# Altium PCB HF_Voltage_Transformer.PcbDoc
Units mil, origin at the board's own origin, x right, y up, seen from the top; angles counter-clockwise.
Board outline 3937.01 x 3937.01 mil, 2 copper layers (Top Layer, Bottom Layer); 48 components, 31 nets, 145 pads, 25 vias.
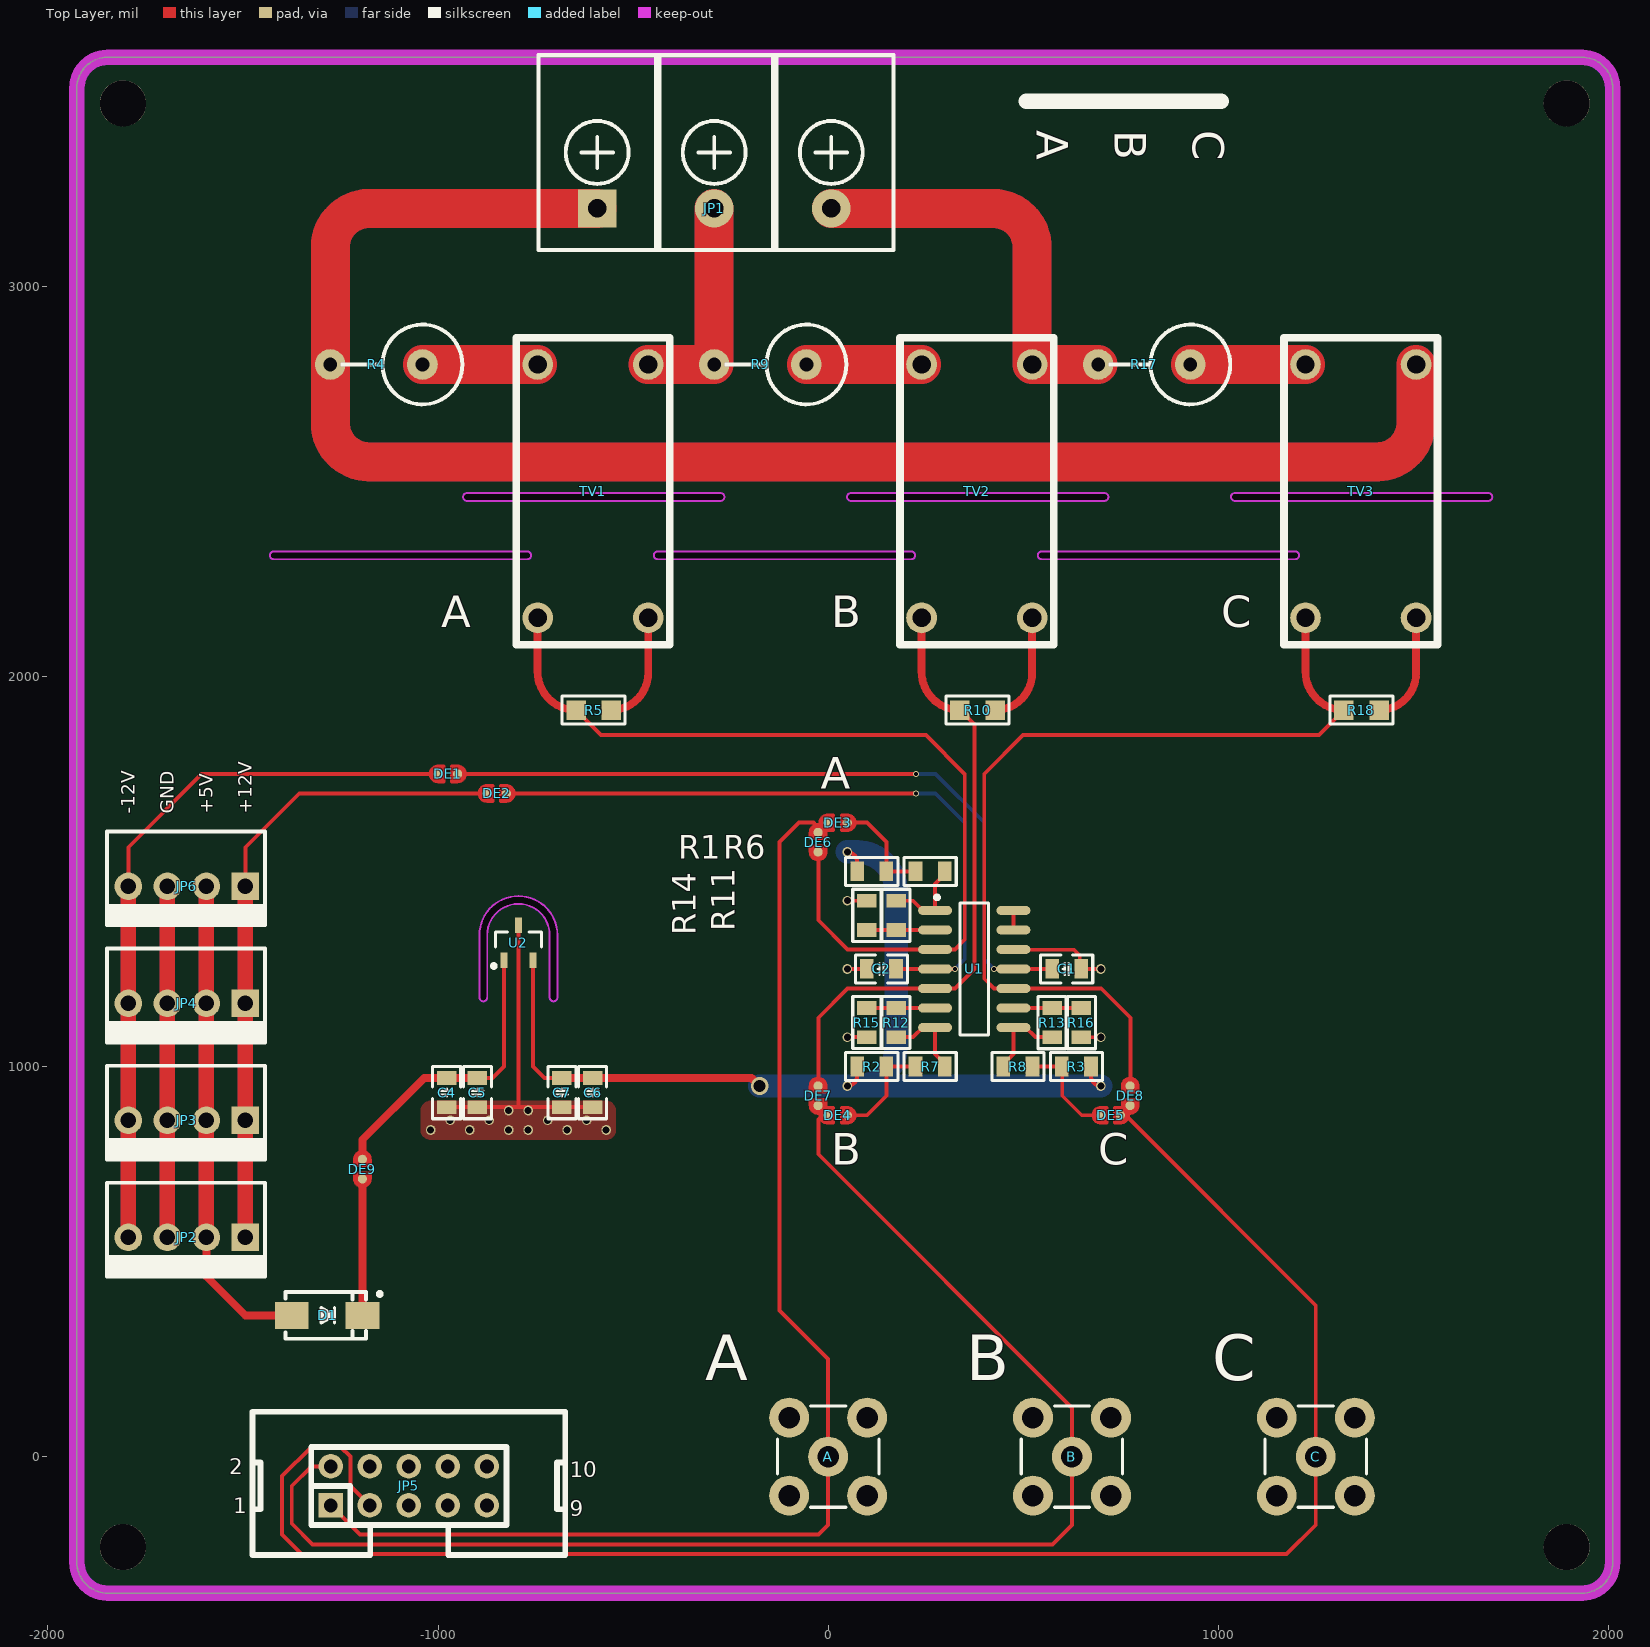
[diagram p0: Top Layer view]
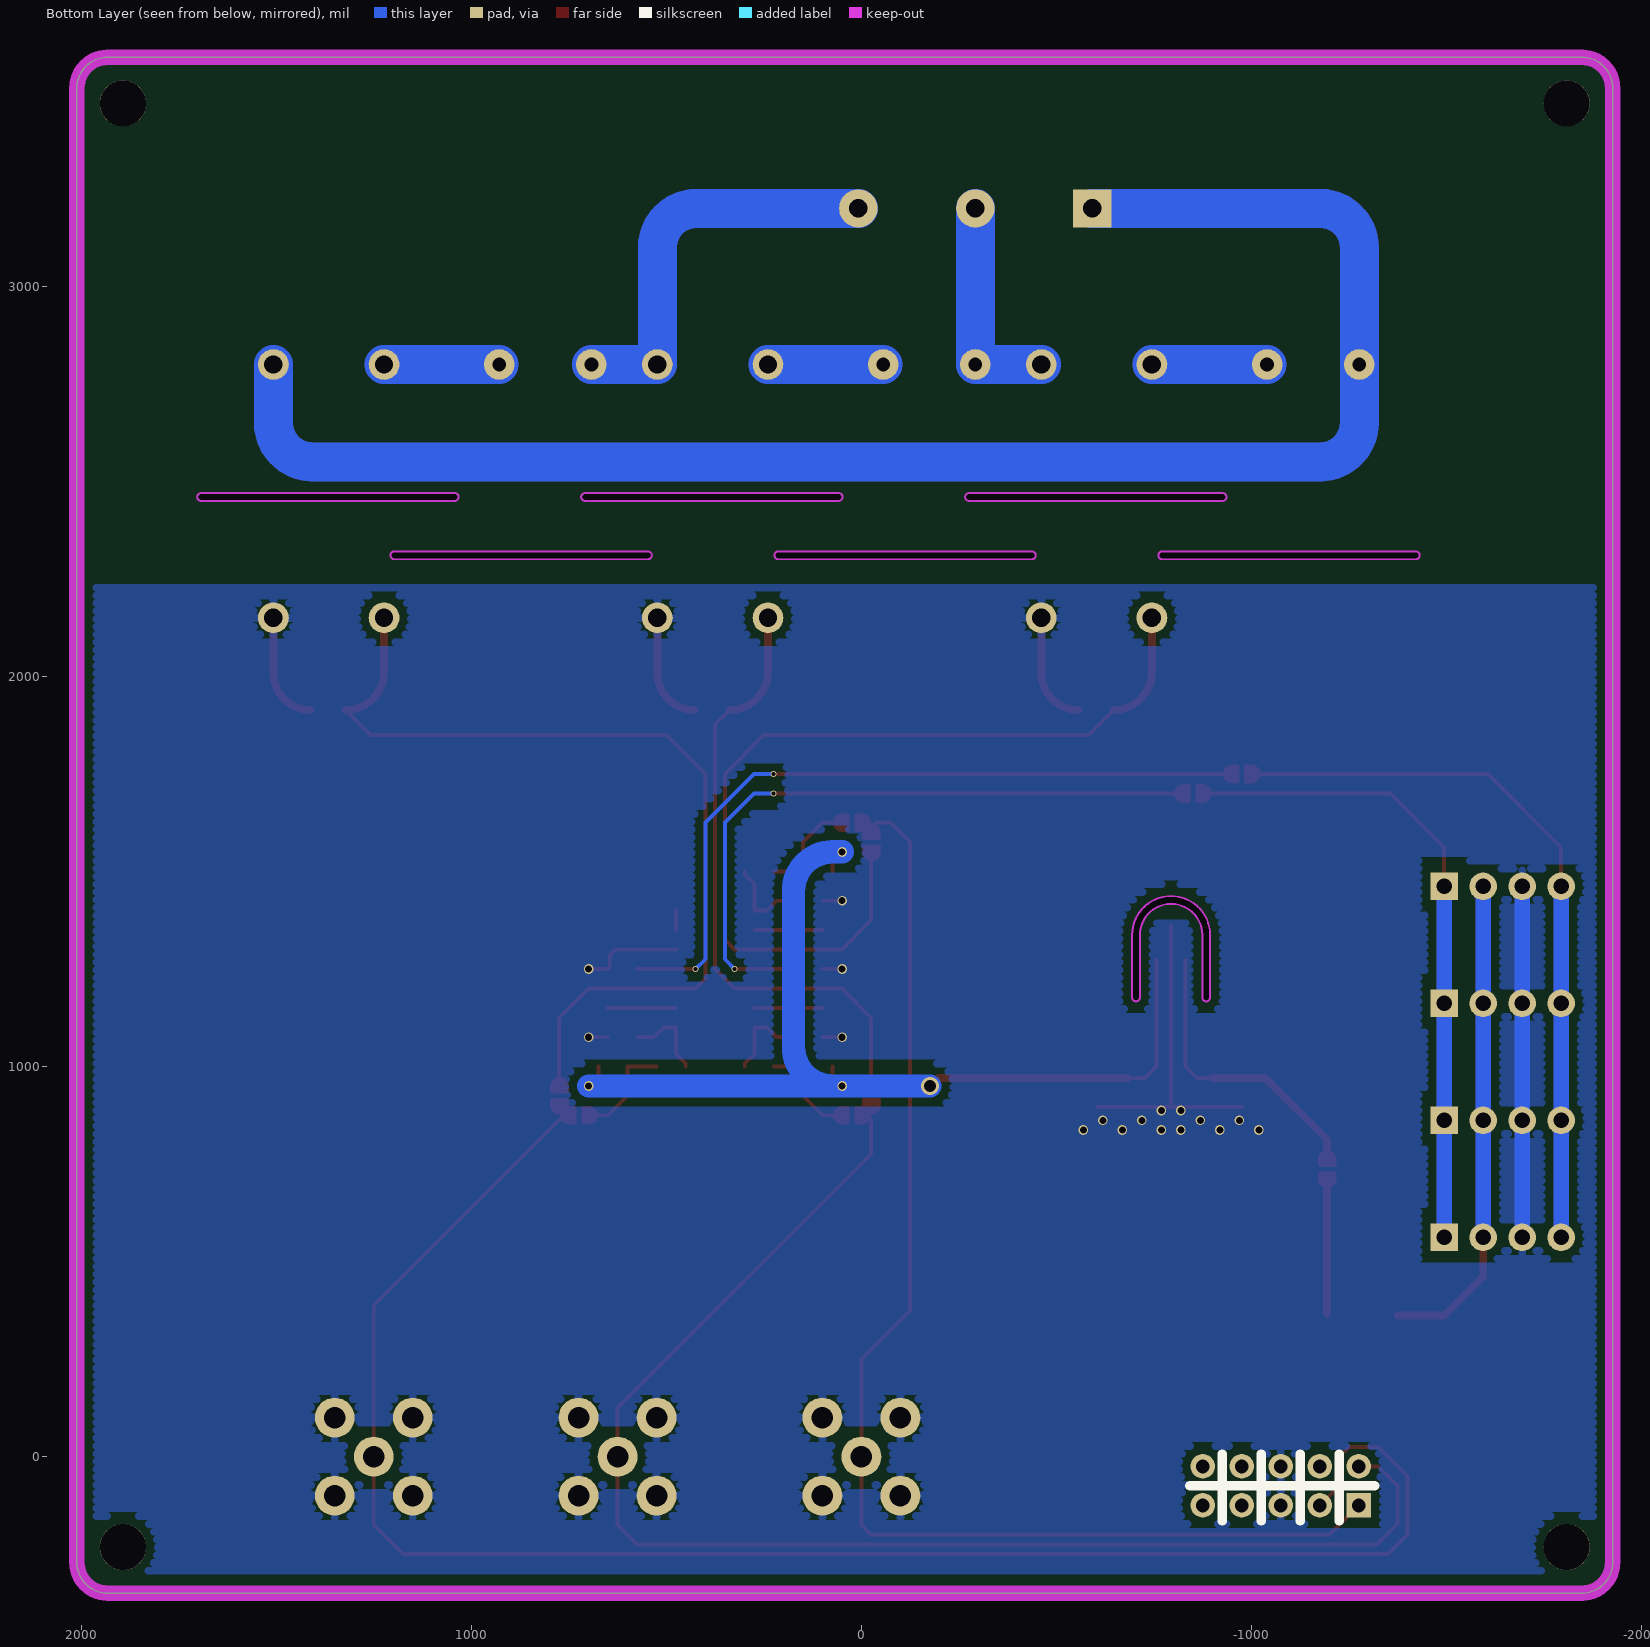
[diagram p1: Bottom Layer view, seen from below]

## Layer stack, top to bottom
Top Solder: solder mask 0.4, Solder Resist, Dk 3.5
Top Layer: signal copper 1.4
Dielectric 1: dielectric 12.6, FR-4, Dk 4.8
Bottom Layer: signal copper 1.4
Bottom Solder: solder mask 0.4, Solder Resist, Dk 3.5

## Board outline
-1925.94,-271.26 -1925.94,3508.27 cw(c-1847.2,3508.27) -1847.2,3587.01 1932.32,3587.01 cw(c1932.32,3508.27) 2011.06,3508.27 2011.06,-271.26 cw(c1932.32,-271.26) 1932.32,-350 -1847.2,-350 cw(c-1847.2,-271.26)
cut-out: -893.98,1177.4 -893.98,1337.4 cw(c-793.98,1337.4) -793.98,1437.4 cw(c-793.98,1337.4) -693.98,1337.4 -693.98,1177.4 cw(c-703.98,1177.4) -703.98,1167.4 cw(c-703.98,1177.4) -713.98,1177.4 -713.98,1337.4 ccw(c-793.98,1337.4) -793.98,1417.4 ccw(c-793.98,1337.4) -873.98,1337.4 -873.98,1177.4 cw(c-883.98,1177.4) -883.98,1167.4 cw(c-883.98,1177.4)
cut-out: 1032.56,2460 ccw(c1042.56,2460) 1042.56,2450 1692.56,2450 ccw(c1692.56,2460) 1702.56,2460 ccw(c1692.56,2460) 1692.56,2470 1042.56,2470 ccw(c1042.56,2460)
cut-out: 547.2,2300.39 1197.2,2300.39 ccw(c1197.2,2310.39) 1207.2,2310.39 ccw(c1197.2,2310.39) 1197.2,2320.39 547.2,2320.39 ccw(c547.2,2310.39) 537.2,2310.39 ccw(c547.2,2310.39)
cut-out: 58.31,2450 cw(c58.31,2460) 48.31,2460 cw(c58.31,2460) 58.31,2470 708.31,2470 cw(c708.31,2460) 718.31,2460 cw(c708.31,2460) 708.31,2450
cut-out: -925.94,2450 cw(c-925.94,2460) -935.94,2460 cw(c-925.94,2460) -925.94,2470 -275.94,2470 cw(c-275.94,2460) -265.94,2460 cw(c-275.94,2460) -275.94,2450
cut-out: -437.05,2300.39 212.95,2300.39 ccw(c212.95,2310.39) 222.95,2310.39 ccw(c212.95,2310.39) 212.95,2320.39 -437.05,2320.39 ccw(c-437.05,2310.39) -447.05,2310.39 ccw(c-437.05,2310.39)
cut-out: -1421.3,2300.39 cw(c-1421.3,2310.39) -1431.3,2310.39 cw(c-1421.3,2310.39) -1421.3,2320.39 -771.3,2320.39 cw(c-771.3,2310.39) -761.3,2310.39 cw(c-771.3,2310.39) -771.3,2300.39

## Design rules (kind name [scope] priority, off if disabled: settings)
Clearance [All] p1: gap=10 ignorepadtopadclearanceinfootprint=FALSE except(0: Arc-Hole Track-Hole SMDPad-Hole THPad-Hole Via-Hole Text-Hole; 20: Arc-Fill Arc-Poly Track-Fill Track-Poly SMDPad-Fill SMDPad-Poly THPad-Fill THPad-Poly Via-Fill Via-Poly Fill-Fill Fill-Poly Fill-Text Fill-Hole Poly-Poly Poly-Region Poly-Text Poly-Hole)
HoleSize [All] p1 off: absolutevalues=TRUE maxlimit=100 minlimit=1 maxpercent=80.000 minpercent=20.000
MinimumSolderMaskSliver [All] p1 off: minsoldermaskwidth=10
PlaneConnect [All] p1: pad.planeconnectstyle=Relief pad.reliefexpansion=20 pad.reliefentries=4 pad.reliefconductorwidth=20 pad.reliefairgap=5 via.planeconnectstyle=Direct via.reliefexpansion=20 via.reliefentries=4 via.reliefconductorwidth=10 via.reliefairgap=10
PolygonConnect [All] p1: thpad.connectstyle=Relief thpad.reliefconductorwidth=20 thpad.reliefentries=4 thpad.polygonreliefangle="90 Angle" thpad.airgapwidth=5 smdpad.connectstyle=Direct smdpad.reliefconductorwidth=10 smdpad.reliefentries=4 smdpad.polygonreliefangle="90 Angle" smdpad.airgapwidth=10 via.connectstyle=Direct via.reliefconductorwidth=10 via.reliefentries=4 via.polygonreliefangle="90 Angle" via.airgapwidth=10
RoutingVias [All] p1: holewidth=28 width=50 viastyle="Through Hole" minholewidth=28 minwidth=50 maxholewidth=28 maxwidth=50
SilkToSilkClearance [All] p1 off: silktosilkclearance=10
SilkToSolderMaskClearance [IsPad] p1 off: minsilkscreentomaskgap=10 clearancetoexposedcopper=TRUE
SolderMaskExpansion [All] p1: expansion=4 istentingtop=FALSE
Width [All] p1: maxlimit=393.7 minlimit=5 preferedwidth=10
25 further rules are at their usual default settings.

## Components (designator, comment, footprint, x,y, rotation, side; value= is the part's Value field where it differs from the comment)
A "SMA WIFI 天线接口" SMA-KE-LI 0,0 r0 top (schematic designator A1)
B "SMA WIFI 天线接口" SMA-KE-LI 625,0 r0 top (schematic designator B1)
C "SMA WIFI 天线接口" SMA-KE-LI 1250,0 r0 top (schematic designator C3)
C1 "104" "C 0805_L" 611.45,1250 r180 top
C2 "104" "C 0805_L" 136.66,1250 r0 top
C4 "475" "C 0805_L" -977.92,933.07 r90 top
C5 "104" "C 0805_L" -899.18,933.07 r90 top
C6 "475" "C 0805_L" -603.9,933.07 r90 top
C7 "104" "C 0805_L" -682.64,933.07 r90 top
D1 "SS34" SMA -1284.53,362.01 r0 top
DE1 "DEBUG PAD" DEBUG_B#1 -975,1750 r0 top
DE2 "DEBUG PAD" DEBUG_B#2 -850,1700 r0 top
DE3 "DEBUG PAD" DEBUG_B#3 24.06,1625 r0 top
DE4 "DEBUG PAD" DEBUG_B#4 24.06,875 r0 top
DE5 "DEBUG PAD" DEBUG_B#5 724.06,875 r180 top
DE6 "DEBUG PAD" DEBUG_B#6 -25.94,1575 r90 top
DE7 "DEBUG PAD" DEBUG_B#7 -25.94,925 r270 top
DE8 "DEBUG PAD" DEBUG_B#8 774.06,925 r270 top
DE9 "DEBUG PAD" DEBUG_B#9 -1193.98,737.01 r90 top
JP1 "HDR-1X3" KF7620-3P -292.09,3343.31 r0 top
JP2 "HDR-1X4" KF2510-LI-4P -1643.98,562.01 r180 top
JP3 "HDR-1X4" KF2510-LI-4P -1643.98,862.01 r180 top
JP4 "HDR-1X4" KF2510-LI-4P -1643.98,1162.01 r180 top
JP5 "Header 5X2" IDC2.54-LI-2x5P -1275,-125 r0 top
JP6 "HDR-1X4" KF2510-LI-4P -1643.98,1462.01 r180 top
R1 "10K" "R 0805_L" 111.66,1500 r0 top
R2 "10K" "R 0805_L" 111.66,1000 r0 top
R3 "10K" "R 0805_L" 636.45,1000 r180 top
R4 "51K" "RS 2W-V6" -1040.12,2799.61 r180 top
R5 "100" "R 0805_M" -601.42,1913.78 r180 top
R6 "10K" "R 0805_L" 261.46,1500 r0 top
R7 "10K" "R 0805_L" 261.46,1000 r0 top
R8 "10K" "R 0805_L" 486.45,1000 r180 top
R9 "51K" "RS 2W-V6" -55.87,2799.61 r180 top
R10 "100" "R 0805_M" 382.83,1913.78 r180 top
R11 "10K" "R 0805_L" 174.06,1387.4 r270 top
R12 "10K" "R 0805_L" 174.05,1112.6 r90 top
R13 "10K" "R 0805_L" 574.05,1112.4 r90 top
R14 "1K" "R 0805_L" 99.06,1387.4 r270 top
R15 "1K" "R 0805_L" 99.05,1112.6 r90 top
R16 "1K" "R 0805_L" 649.05,1112.4 r90 top
R17 "51K" "RS 2W-V6" 928.39,2799.61 r180 top
R18 "100" "R 0805_M" 1367.09,1913.78 r180 top
TV1 "DL-TPT202EA" DL-TPT202EA -603.11,2474.8 r270 top
TV2 "DL-TPT202EA" DL-TPT202EA 381.14,2474.8 r270 top
TV3 "DL-TPT202EA" DL-TPT202EA 1365.39,2474.8 r270 top
U1 "LM324" SOIC-14 374.53,1250 r0 top
U2 "REF3030" SOT23-3L -793.98,1317.72 r0 top

## Footprints (in the part's own frame and the unit in brackets; to place one, negate y for a bottom-side part, rotate by r counter-clockwise, add the part's x,y. Pads: shape width x height; smd on the part's side, far side on the other; paste and mask are expansions set on the pad)
"C 0805_L" [mil] "无极性贴片电容"
  rect 35x50 smd: 1(-37.4,0) 2(37.4,0)
  silkscreen extent -67,-36 67,36, body extent -39,-24 39,24, height 20
DEBUG_B#1 [mm] "调试断点焊盘"
  round 0.6 smd paste-0.6: 1(-0.635,0) 2(0.635,0)
  Top Layer region: 0.254,-0.508 0.762,-0.508 0.908,-0.479 1.031,-0.396 1.114,-0.273 1.143,-0.127 1.143,-0.127 1.143,0 1.104,0.194 0.994,0.359 0.829,0.469 0.635,0.508 0.635,0.508 0.254,0.508
  Top Layer region: -0.254,0.508 -0.762,0.508 -0.908,0.479 -1.031,0.396 -1.114,0.273 -1.143,0.127 -1.143,0.127 -1.143,0 -1.104,-0.194 -0.994,-0.359 -0.829,-0.469 -0.635,-0.508 -0.635,-0.508 -0.254,-0.508
  Top Layer lines w0.203: -1.143,0 ccw(c-0.635,0) -0.635,-0.508 -0.254,-0.508 -0.254,0.508 -0.635,0.508 ccw(c-0.635,0) -1.143,0 ; 0.254,-0.508 0.254,0 0.254,0.508 0.635,0.508 cw(c0.635,0) 1.143,0 cw(c0.635,0) 0.635,-0.508 0.254,-0.508
DEBUG_B#2 [mm] "调试断点焊盘"
  round 0.6 smd paste-0.6: 1(-0.635,0) 2(0.635,0)
  Top Layer region: 0.254,-0.508 0.762,-0.508 0.908,-0.479 1.031,-0.396 1.114,-0.273 1.143,-0.127 1.143,-0.127 1.143,0 1.104,0.194 0.994,0.359 0.829,0.469 0.635,0.508 0.635,0.508 0.254,0.508
  Top Layer region: -0.254,0.508 -0.762,0.508 -0.908,0.479 -1.031,0.396 -1.114,0.273 -1.143,0.127 -1.143,0.127 -1.143,0 -1.104,-0.194 -0.994,-0.359 -0.829,-0.469 -0.635,-0.508 -0.635,-0.508 -0.254,-0.508
  Top Layer lines w0.203: -1.143,0 ccw(c-0.635,0) -0.635,-0.508 -0.254,-0.508 -0.254,0.508 -0.635,0.508 ccw(c-0.635,0) -1.143,0 ; 0.254,-0.508 0.254,0.508 0.635,0.508 cw(c0.635,0) 1.143,0 cw(c0.635,0) 0.635,-0.508 0.254,-0.508
DEBUG_B#3 [mm] "调试断点焊盘"
  round 0.6 smd paste-0.6: 1(-0.635,0) 2(0.635,0)
  Top Layer region: 0.254,-0.508 0.762,-0.508 0.908,-0.479 1.031,-0.396 1.114,-0.273 1.143,-0.127 1.143,-0.127 1.143,0 1.104,0.194 0.994,0.359 0.829,0.469 0.635,0.508 0.635,0.508 0.254,0.508
  Top Layer region: -0.254,0.508 -0.762,0.508 -0.908,0.479 -1.031,0.396 -1.114,0.273 -1.143,0.127 -1.143,0.127 -1.143,0 -1.104,-0.194 -0.994,-0.359 -0.829,-0.469 -0.635,-0.508 -0.635,-0.508 -0.254,-0.508
  Top Layer lines w0.203: -1.121,-0.149 ccw(c-0.635,0) -0.784,-0.486 ccw(c-0.635,0) -0.635,-0.508 -0.254,-0.508 -0.254,0.508 -0.635,0.508 ccw(c-0.635,0) -1.121,-0.149 ; 0.254,-0.508 0.254,0.508 0.635,0.508 cw(c0.635,0) 0.635,-0.508 0.254,-0.508
DEBUG_B#4 [mm] "调试断点焊盘"
  round 0.6 smd paste-0.6: 1(-0.635,0) 2(0.635,0)
  Top Layer region: 0.254,-0.508 0.762,-0.508 0.908,-0.479 1.031,-0.396 1.114,-0.273 1.143,-0.127 1.143,-0.127 1.143,0 1.104,0.194 0.994,0.359 0.829,0.469 0.635,0.508 0.635,0.508 0.254,0.508
  Top Layer region: -0.254,0.508 -0.762,0.508 -0.908,0.479 -1.031,0.396 -1.114,0.273 -1.143,0.127 -1.143,0.127 -1.143,0 -1.104,-0.194 -0.994,-0.359 -0.829,-0.469 -0.635,-0.508 -0.635,-0.508 -0.254,-0.508
  Top Layer lines w0.203: -1.121,-0.149 ccw(c-0.635,0) -0.635,-0.508 -0.254,-0.508 -0.254,0.508 -0.635,0.508 ccw(c-0.635,0) -0.784,0.486 ccw(c-0.635,0) -1.121,0.149 ccw(c-0.635,0) -1.121,-0.149 ; 0.254,-0.508 0.254,0.508 0.635,0.508 cw(c0.635,0) 0.635,-0.508 0.254,-0.508
DEBUG_B#5 [mm] "调试断点焊盘"
  round 0.6 smd paste-0.6: 1(-0.635,0) 2(0.635,0)
  Top Layer region: 0.254,-0.508 0.762,-0.508 0.908,-0.479 1.031,-0.396 1.114,-0.273 1.143,-0.127 1.143,-0.127 1.143,0 1.104,0.194 0.994,0.359 0.829,0.469 0.635,0.508 0.635,0.508 0.254,0.508
  Top Layer region: -0.254,0.508 -0.762,0.508 -0.908,0.479 -1.031,0.396 -1.114,0.273 -1.143,0.127 -1.143,0.127 -1.143,0 -1.104,-0.194 -0.994,-0.359 -0.829,-0.469 -0.635,-0.508 -0.635,-0.508 -0.254,-0.508
  Top Layer lines w0.203: 1.143,0 ccw(c0.635,0) 0.635,0.508 0.254,0.508 0.254,-0.508 0.635,-0.508 ccw(c0.635,0) 1.143,0 ; -0.254,0.508 -0.635,0.508 ccw(c-0.635,0) -1.121,0.149 ccw(c-0.635,0) -1.121,-0.149 ccw(c-0.635,0) -0.784,-0.486 ccw(c-0.635,0) -0.635,-0.508 -0.254,-0.508 -0.254,0.508
DEBUG_B#6 [mm] "调试断点焊盘"
  round 0.6 smd paste-0.6: 1(-0.635,0) 2(0.635,0)
  Top Layer region: 0.254,-0.508 0.762,-0.508 0.908,-0.479 1.031,-0.396 1.114,-0.273 1.143,-0.127 1.143,-0.127 1.143,0 1.104,0.194 0.994,0.359 0.829,0.469 0.635,0.508 0.635,0.508 0.254,0.508
  Top Layer region: -0.254,0.508 -0.762,0.508 -0.908,0.479 -1.031,0.396 -1.114,0.273 -1.143,0.127 -1.143,0.127 -1.143,0 -1.104,-0.194 -0.994,-0.359 -0.829,-0.469 -0.635,-0.508 -0.635,-0.508 -0.254,-0.508
  Top Layer lines w0.203: -0.635,0.508 ccw(c-0.635,0) -0.635,-0.508 -0.254,-0.508 -0.254,0.508 -0.635,0.508 ; 0.254,0.508 0.254,-0.508 0.635,-0.508 ccw(c0.635,0) 0.784,-0.486 ccw(c0.635,0) 1.121,-0.149 ccw(c0.635,0) 1.121,0.149 ccw(c0.635,0) 0.635,0.508 0.254,0.508
DEBUG_B#7 [mm] "调试断点焊盘"
  round 0.6 smd paste-0.6: 1(-0.635,0) 2(0.635,0)
  Top Layer region: 0.254,-0.508 0.762,-0.508 0.908,-0.479 1.031,-0.396 1.114,-0.273 1.143,-0.127 1.143,-0.127 1.143,0 1.104,0.194 0.994,0.359 0.829,0.469 0.635,0.508 0.635,0.508 0.254,0.508
  Top Layer region: -0.254,0.508 -0.762,0.508 -0.908,0.479 -1.031,0.396 -1.114,0.273 -1.143,0.127 -1.143,0.127 -1.143,0 -1.104,-0.194 -0.994,-0.359 -0.829,-0.469 -0.635,-0.508 -0.635,-0.508 -0.254,-0.508
  Top Layer lines w0.203: 0.635,-0.508 ccw(c0.635,0) 1.121,0.149 ccw(c0.635,0) 0.784,0.486 ccw(c0.635,0) 0.635,0.508 0.254,0.508 0.254,-0.508 0.635,-0.508 ; -0.254,-0.508 -0.254,0 -0.254,0.508 -0.635,0.508 ccw(c-0.635,0) -0.635,-0.508 -0.254,-0.508
DEBUG_B#8 [mm] "调试断点焊盘"
  round 0.6 smd paste-0.6: 1(-0.635,0) 2(0.635,0)
  Top Layer region: 0.254,-0.508 0.762,-0.508 0.908,-0.479 1.031,-0.396 1.114,-0.273 1.143,-0.127 1.143,-0.127 1.143,0 1.104,0.194 0.994,0.359 0.829,0.469 0.635,0.508 0.635,0.508 0.254,0.508
  Top Layer region: -0.254,0.508 -0.762,0.508 -0.908,0.479 -1.031,0.396 -1.114,0.273 -1.143,0.127 -1.143,0.127 -1.143,0 -1.104,-0.194 -0.994,-0.359 -0.829,-0.469 -0.635,-0.508 -0.635,-0.508 -0.254,-0.508
  Top Layer lines w0.203: 0.635,-0.508 ccw(c0.635,0) 0.784,-0.486 ccw(c0.635,0) 1.121,-0.149 ccw(c0.635,0) 0.635,0.508 0.254,0.508 0.254,-0.508 0.635,-0.508 ; -0.254,-0.508 -0.635,-0.508 cw(c-0.635,0) -1.142,0.024 cw(c-0.635,0) -0.635,0.508 -0.254,0.508 -0.254,-0.508
DEBUG_B#9 [mm] "调试断点焊盘"
  round 0.6 smd paste-0.6: 1(-0.635,0) 2(0.635,0)
  Top Layer region: 0.254,-0.508 0.762,-0.508 0.908,-0.479 1.031,-0.396 1.114,-0.273 1.143,-0.127 1.143,-0.127 1.143,0 1.104,0.194 0.994,0.359 0.829,0.469 0.635,0.508 0.635,0.508 0.254,0.508
  Top Layer region: -0.254,0.508 -0.762,0.508 -0.908,0.479 -1.031,0.396 -1.114,0.273 -1.143,0.127 -1.143,0.127 -1.143,0 -1.104,-0.194 -0.994,-0.359 -0.829,-0.469 -0.635,-0.508 -0.635,-0.508 -0.254,-0.508
  Top Layer lines w0.203: -0.635,0.508 ccw(c-0.635,0) -1.143,0 ccw(c-0.635,0) -0.635,-0.508 -0.254,-0.508 -0.254,0.508 -0.635,0.508 ; 0.254,0.508 0.635,0.508 cw(c0.635,0) 0.994,0.359 cw(c0.635,0) 1.143,0 cw(c0.635,0) 0.994,-0.359 cw(c0.635,0) 0.635,-0.508 0.254,-0.508 0.254,0.508
DL-TPT202EA [mm] "高频电压互感器 - 南京向上 - 2mA/2mA"
  round 2 hole 1.2: 1(-8.25,-3.6) 2(-8.25,3.6) 3(8.25,3.6) 4(8.25,-3.6)
  silkscreen extent -10,-5 10,5
IDC2.54-LI-2x5P [mm] "10P简易牛角座"
  rect 1.6x1.6 hole 0.9: 1(0,0)
  round 1.6 hole 0.9: 2(0,2.54) 3(2.54,0) 4(2.54,2.54) 5(5.08,0) 6(5.08,2.54) 7(7.62,0) 8(7.62,2.54) 9(10.16,0) 10(10.16,2.54)
  silkscreen extent -5.11,-3.23 15.27,6.1, body extent -5.08,-3.08 15.24,5.77, height 9.17
KF2510-LI-4P [mm] "接插件/2A"
  rect 1.8x1.8 hole 1: 1(-3.81,0)
  round 1.8 hole 1: 2(-1.27,0) 3(1.27,0) 4(3.81,0)
  silkscreen extent -5.08,-3.56 5.21,2.54, body extent -5.08,-3.5 5.08,2.4, height 11.05
KF7620-3P [mm] "22.8*12*12mm(长宽高)"
  rect 2.5x2.5 hole 1.2: 1(-7.62,-3.65)
  round 2.5 hole 1.2: 2(0,-3.65) 3(7.62,-3.65)
  silkscreen extent -11.43,-6.35 11.68,6.35, body extent -11.43,-6.2 12.13,6.2, height 12.45
"R 0805_L" [mil] "1/8W贴片电阻   https://item.taobao.com/item.htm?ft=t&id=613637044352"
  rect 35x50 smd: 1(-37.4,0) 2(37.4,0)
  silkscreen extent -67,-36 67,36, body extent -39,-25 39,25, height 20
"R 0805_M" [mil] "1/8W贴片电阻"
  rect 50x50 smd: 1(-45,0) 2(45,0)
  silkscreen extent -81,-36 81,36, body extent -39,-25 39,25, height 20
"RS 2W-V6" [mm] "直插色环电阻，脚距6mm，直径5mm"
  round 2 hole 0.9: 1(6,0) 2(0,0)
  silkscreen extent -2.6,-2.6 5.2,2.6, body extent -2.51,-2.51 6.4,2.51, height 17.6
SMA [mm] "4.5x2.6*2.2mm（长宽高，不包括引脚）"
  rect 2.2x1.75 smd: 1(-2.3,0) 2(2.3,0)
  silkscreen extent -2.7,-1.52 3.56,1.52, body extent -2.53,-1.3 2.58,1.3, height 2.15
SMA-KE-LI [mm] "SMA 立式直插射频天线座"
  round 2.6 hole 1.4: 1(0,0) 2(-2.54,-2.54) 2(2.54,-2.54) 3(-2.54,2.54) 3(2.54,2.54)
  silkscreen extent -3.3,-3.3 3.3,3.3, body extent -3.25,-3.25 3.25,3.25, height 10.35
SOIC-14 [mm] "SOP, 14-Leads,"
  oval 2.2x0.6 smd: 1(-2.552,3.81) 2(-2.552,2.54) 3(-2.552,1.27) 4(-2.552,0) 5(-2.552,-1.27) 6(-2.552,-2.54) 7(-2.552,-3.81) 8(2.552,-3.81) 9(2.552,-2.54) 10(2.552,-1.27) 11(2.552,0) 12(2.552,1.27) 13(2.552,2.54) 14(2.552,3.81)
  silkscreen extent -2.55,-4.3 0.93,4.78, body extent -3,-4.35 2.99,4.35, height 1.55
SOT23-3L [mm] "3x1.3x1mm(长宽高)"
  rect 0.45x1 smd: 1(-0.95,-1.143) 2(0.95,-1.143) 3(0,1.125)
  silkscreen extent -1.72,-1.65 1.5,0.7, body extent -1.5,-1.2 1.5,1.2, height 1.05

## Part data
A B C: library part "SMA WIFI", "SMA-2.4G射频天线接口", BOM名称=SMA-2.4G射频天线接口, 下单链接=https://item.taobao.com/item.htm?ft=t&id=613637044352, 淘宝ID=小糖豆的小窝窝
C1 C2 C4 C5 C6 C7: library part C, "贴片电容", BOM名称=贴片电容, 下单链接=https://item.taobao.com/item.htm?ft=t&id=613637044352, 淘宝ID=小糖豆的小窝窝
D1: library part 1N4007, "整流二极管", BOM名称=整流二极管, 下单链接=https://item.taobao.com/item.htm?ft=t&id=613637044352, 淘宝ID=小糖豆的小窝窝
DE1 DE2 DE3 DE4 DE5 DE6 DE7 DE8 DE9: library part DEBUG, "调试断点焊盘", BOM名称=调试断点焊盘, 下单链接=https://item.taobao.com/item.htm?ft=t&id=613637044352, 淘宝ID=小糖豆的小窝窝
JP1: library part "Header 3", "3P接插件", BOM名称=3P接插件, 下单链接=https://item.taobao.com/item.htm?ft=t&id=613637044352, 淘宝ID=小糖豆的小窝窝
JP2 JP3 JP4 JP6: library part "Header 4", "4P接插件", BOM名称=4P接插件, 下单链接=https://item.taobao.com/item.htm?ft=t&id=613637044352, 淘宝ID=小糖豆的小窝窝
JP5: "5*2P接插件", BOM名称=5*2P接插件, 下单链接=https://item.taobao.com/item.htm?ft=t&id=613637044352, 淘宝ID=小糖豆的小窝窝
R1 R2 R3 R5 R6 R7 R8 R10 R11 R12 R13 R14 R15 R16 R18: library part R, "贴片电阻", BOM名称=贴片电阻, 下单链接=https://item.taobao.com/item.htm?ft=t&id=613637044352, 淘宝ID=小糖豆的小窝窝
R4 R9 R17: library part Res, "色环电阻", BOM名称=色环电阻, 下单链接=https://item.taobao.com/item.htm?ft=t&id=613637044352, 淘宝ID=小糖豆的小窝窝
TV1 TV2 TV3: "高频电压互感器 - 南京向上 - 2mA/2mA"
U1: "4路运放", Alias1=https://item.taobao.com/item.htm?ft=t&id=613637044352, BOM名称=4路运放, 淘宝ID=小糖豆的小窝窝

## Free pads (board coordinates)
  round 118.11 hole 118.11: Q(-1807.83,-231.89) Q(-1807.83,3468.9) Q(1892.95,-231.89) Q(1892.95,3468.9)

## Via types
v1: diameter 25, hole 18, Top Layer to Bottom Layer, 20 vias
v2: diameter 15, hole 10, Top Layer to Bottom Layer, 4 vias
v3: diameter 45, hole 30, Top Layer to Bottom Layer, 1 vias

## Nets (pads, with @x,y where several pads share a name; then routed paths per layer and width w, separated by ;. In a path a pad name is that pad's centre, name@x,y a point inside that pad or via, vN(x,y) a via of type N, cw(c..) or ccw(c..) an arc to the next point about the centre after c; other vN are vias at no path point)
+5: D1.1 JP2.2 JP3.2 JP4.2 JP6.2 | length 2160.3
  Top Layer w20: JP2.2 -1593.98,462.01 -1493.98,362.01 D1.1
  Top Layer w40: JP2.2 JP3.2 JP4.2 JP6.2
  Bottom Layer w40: JP2.2 JP3.2 JP4.2 JP6.2
+12: DE2.1 JP2.1 JP3.1 JP4.1 JP6.1 | length 2576.1
  Top Layer w10: JP6.1 -1493.98,1562.01 -1355.98,1700 -895,1700 DE2.1
  Top Layer w40: JP2.1 JP3.1 JP4.1 JP6.1
  Bottom Layer w40: JP2.1 JP3.1 JP4.1 JP6.1
-12: DE1.1 JP2.4 JP3.4 JP4.4 JP6.4 | length 2771.8
  Top Layer w10: JP6.4 -1793.98,1562.01 -1605.98,1750 -1020,1750 DE1.1
  Top Layer w40: JP2.4 JP3.4 JP4.4 JP6.4
  Bottom Layer w40: JP2.4 JP3.4 JP4.4 JP6.4
A: JP1.1 R4.1 TV3.2 | length 8476.3
  Top Layer w100: JP1.1 -1176.34,3199.61 ccw(c-1176.34,3099.61) -1276.34,3099.61 R4.1 -1276.34,2650 ccw(c-1176.34,2650) -1176.34,2550 1407.13,2550 ccw(c1407.13,2650) 1507.13,2650 TV3.2
  Bottom Layer w100: JP1.1 -1176.34,3199.61 ccw(c-1176.34,3099.61) -1276.34,3099.61 R4.1 -1276.34,2650 ccw(c-1176.34,2650) -1176.34,2550 1407.13,2550 ccw(c1407.13,2650) 1507.13,2650 TV3.2
B: JP1.2 R9.1 TV1.2 | length 1138.6
  Top Layer w100: TV1.2 R9.1 JP1.2
  Bottom Layer w100: TV1.2 R9.1 JP1.2
C: JP1.3 R17.1 TV2.2 | length 2082.7
  Top Layer w100: JP1.3 422.87,3199.61 cw(c422.87,3099.61) 522.87,3099.61 TV2.2 R17.1
  Bottom Layer w100: JP1.3 422.87,3199.61 cw(c422.87,3099.61) 522.87,3099.61 TV2.2 R17.1
GND: A.2 A.3 B.2 B.3 C1.1 C2.1 C4.1 C5.1 C6.1 C7.1 C.2 C.3 JP2.3 JP3.3 JP4.3 JP5.5 JP5.6 JP6.3 R5.1 R10.1 R14.1 R15.1 R16.1 R18.1 TV1.3 TV2.3 TV3.3 U1.12 U2.3 | length 4086.5
  Top Layer w10: C4.1 C5.1@-891.67,895.67 ; U2.3 -793.98,895.67 C5.1@-891.67,895.67 ; C6.1 C7.1 C5.1@-891.67,895.67 ; v1(49.06,1075) 49.06,1075.2 R15.1 ; v1(49.06,1250) C2.1 ; v1(49.06,1425) 49.06,1424.8 R14.1 ; R15.1@85.14,1075.2 R15.1@99.01,1075.2 ; U1.12 475.79,1299.21 629.92,1299.21 644.99,1284.14 644.99,1253.87 C1.1 v1(699.06,1250) ; R16.1 v1(699.06,1075)
  Top Layer w20: R5.1 ccw(c-556.42,2008.82) -461.38,2008.82 TV1.3 ; R10.1 ccw(c427.83,2008.82) 522.87,2008.82 TV2.3 ; R18.1 ccw(c1412.09,2008.82) 1507.13,2008.82 TV3.3
  Top Layer w40: JP2.3 JP3.3 JP4.3 JP6.3
  Bottom Layer w40: JP2.3 JP3.3 JP4.3 JP6.3
  other v1: -1018.98,837.01 -918.98,837.01 -818.98,837.01 -768.98,837.01 -668.98,837.01 -568.98,837.01 -968.98,862.01 -868.98,862.01 -718.98,862.01 -618.98,862.01 -818.98,887.01 -768.98,887.01
NetC1_2: C1.2 DE1.2 U1.11 | length 1936.2
  Top Layer w10: DE1.2 -930,1750 v2(225,1750) ; v2(425,1250) U1.11 C1.2
  Bottom Layer w10: v2(225,1750) 275,1750 400,1625 400,1275 v2(425,1250)
NetC2_2: C2.2 DE2.2 U1.4 | length 1741.4
  Top Layer w10: DE2.2 -805,1700 v2(225,1700) ; C2.2@175,1250 U1.4 v2(325,1250)
  Bottom Layer w10: v2(225,1700) 275,1700 350,1625 350,1275 v2(325,1250)
NetC4_2: C4.2 C5.2 DE9.2 U2.1 | length 763.4
  Top Layer w10: DE9.2 -1193.98,782.01 ; C5.2 -860.51,970.47 -831.38,999.61 U2.1
  Top Layer w20: -1193.98,782.01 -1193.98,812.01 -1035.51,970.47 C4.2 C5.2
NetD1_2: D1.2 DE9.1 | length 328.5
  Top Layer w10: D1.2@-1196.48,364.51 D1.2@-1193.98,367.01
  Top Layer w20: D1.2@-1193.98,367.01 -1193.98,692.01
NetDE3_2: DE3.2 R1.2 R6.1 | length 248.8
  Top Layer w10: 70.94,1625 100,1625 150,1575 R1.2@150,1500.94 ; R1.2 R6.1
NetDE4_2: DE4.2 R2.2 R7.1 | length 248.8
  Top Layer w10: 70.94,875 100,875 150,925 R2.2@150,999.06 ; R2.2 R7.1
NetDE5_2: DE5.2 R3.2 R8.1 | length 269.2
  Top Layer w10: R8.1@525,1000 R3.2 600,999.06 600,925 650,875 679.06,875 DE5.2
NetR4_2: R4.2 TV1.1 | length 590.6
  Top Layer w100: R4.2 TV1.1
  Bottom Layer w100: R4.2 TV1.1
NetR6_2: R6.2 R11.1 U1.1 | length 220.5
  Top Layer w10: R11.1 217.76,1424.8 242.56,1400 U1.1 274.06,1467.7 298.86,1492.5 R6.2
NetR7_2: R7.2 R12.1 U1.7 | length 220.5
  Top Layer w10: R12.1 217.76,1075.2 242.56,1100 U1.7 274.06,1032.3 298.86,1007.5 R7.2
NetR8_2: R8.2 R13.1 U1.8 | length 220.5
  Top Layer w10: R8.2@450.2,1000 450.2,1007.5 475,1032.3 U1.8 506.5,1100 531.3,1075.2 R13.1@575,1075.2
NetR9_2: R9.2 TV2.1 | length 590.6
  Top Layer w100: R9.2 TV2.1
  Bottom Layer w100: R9.2 TV2.1
NetR11_2: R11.2 R14.2 U1.2 | length 175
  Top Layer w10: R14.2 R11.2 U1.2
NetR12_2: R12.2 R15.2 U1.6 | length 175
  Top Layer w10: R15.2 R12.2 U1.6
NetR13_2: R13.2 R16.2 U1.9 | length 175
  Top Layer w10: U1.9 575,1150 R16.2@650,1150
NetR17_2: R17.2 TV3.1 | length 590.6
  Top Layer w100: R17.2 TV3.1
  Bottom Layer w100: R17.2 TV3.1
NetU1_13: U1.13 U1.14 | length 50
  Top Layer w10: U1.13 U1.14
SENSE_A: DE6.1 R5.2 TV1.4 U1.3 | length 2354
  Top Layer w10: R5.2 -582.24,1849.61 250.39,1849.61 350,1750 350,1325 325,1300 U1.3 ; -25,1530.02 -25,1375 50,1300 U1.3@275,1300
  Top Layer w20: TV1.4 -744.84,2147.24 -744.84,2012.2 ccw(c-646.42,2012.2) R5.2
SENSE_B: DE7.1 R10.2 TV2.4 U1.5 | length 1579.3
  Top Layer w10: -25,969.98 -25,1125 50,1200 U1.5@275,1200 ; U1.5 325,1200 375,1250 375,1876.61 R10.2
  Top Layer w20: TV2.4 239.41,2012.2 ccw(c337.83,2012.2) R10.2
SENSE_C: DE8.1 R18.2 TV3.4 U1.10 | length 2399.1
  Top Layer w10: DE8.1 775,950.94 775,969.98 775,1125 700,1200 U1.10 425,1200 400,1225 400,1750 499.61,1849.61 1257.91,1849.61 R18.2
  Top Layer w20: TV3.4 1223.66,2012.2 ccw(c1322.09,2012.2) R18.2
VA: A.1 DE3.1 DE6.2 JP5.1 | length 3246.3
  Top Layer w10: JP5.1 -1200,-200 -25,-200 0,-175 A.1 0,250 -125,375 -125,1575 -75,1625 -37.72,1625 -31.83,1619.11 -20.06,1619.11
VB: B.1 DE4.1 DE7.2 JP5.2 | length 3587.4
  Top Layer w10: JP5.2 -1325,-25 -1375,-75 -1375,-171.72 -1321.72,-225 575,-225 625,-175 B.1 625,125 -25,775 -25,864.17 -20.06,869.11 -20.06,880.89
VC: C.1 DE5.1 DE8.2 JP5.3 | length 4469.4
  Top Layer w10: JP5.3 -1225,-75 -1225,0 -1250,25 -1325,25 -1400,-50 -1400,-200 -1350,-250 1175,-250 1250,-175 C.1 1250,387.28 768.17,869.11 768.17,880.89
Vref: C6.2 C7.2 R1.1 R2.1 R3.1 U2.2 | length 2681.6
  Top Layer w10: U2.2 -756.57,999.61 -727.44,970.47 C7.2 ; v1(49.06,950) ccw(c49.06,975.2) 74.25,975.2 R2.1 ; v1(49.06,1550) cw(c49.06,1524.8) 74.25,1524.8 R1.1 ; R3.1 673.86,975.2 ccw(c699.06,975.2) v1(699.06,950)
  Top Layer w20: C7.2 C6.2 -196.42,970.47 v3(-175.94,950)
  Bottom Layer w60: v3(-175.94,950) v1(49.06,950) 74.06,950 ; v1(49.06,1550) 74.06,1550 cw(c74.06,1450) 174.06,1450 174.06,1050 cw(c74.06,1050) 74.06,950 ; v1(699.06,950) 74.06,950
pads on no net: JP5.4 JP5.7 JP5.8 JP5.9 JP5.10

## Polygon pours and split planes (outlines as drawn)
GND on Top Layer "NONET_L02_P-001" (solid, remove dead copper, pour order 0): -1018.98,912.01 ccw(c-1018.98,887.01) -1043.98,887.01 -1043.98,837.01 ccw(c-1018.98,837.01) -1018.98,812.01 -568.98,812.01 ccw(c-568.98,837.01) -543.98,837.01 -543.98,887.01 ccw(c-568.98,887.01) -568.98,912.01
GND on Bottom Layer "NONET_L02_P-001" (hatched Horizontal grid 20 track 20, remove dead copper, pour order 1): -2018.98,2237.01 2156.02,2237.01 2131.02,2212.01 2131.02,-1162.99 -1668.98,-1162.99 -2118.98,-712.99 -2118.98,2212.01

## Keep-outs
Keep-Out Layer:
  lines w5: -1431.3,2310.39 cw(c-1421.3,2310.39) -1421.3,2320.39 -771.3,2320.39 cw(c-771.3,2310.39) -761.3,2310.39 cw(c-771.3,2310.39) -771.3,2300.39 -1421.3,2300.39 cw(c-1421.3,2310.39) -1431.3,2310.39 ; -935.94,2460 ccw(c-925.94,2460) -925.94,2450 -275.94,2450 ccw(c-275.94,2460) -265.94,2460 ccw(c-275.94,2460) -275.94,2470 -925.94,2470 ccw(c-925.94,2460) -935.94,2460 ; -893.98,1177.01 ccw(c-883.98,1177.01) -883.98,1167.01 ccw(c-883.98,1177.01) -873.98,1177.01 -873.98,1337.01 cw(c-793.98,1337.01) -793.98,1417.01 cw(c-793.98,1337.01) -713.98,1337.01 -713.98,1177.01 ccw(c-703.98,1177.01) -703.98,1167.01 ccw(c-703.98,1177.01) -693.98,1177.01 -693.98,1337.01 ccw(c-793.98,1337.01) -793.98,1437.01 ccw(c-793.98,1337.01) -893.98,1337.01 -893.98,1177.01 ; -447.05,2310.39 ccw(c-437.05,2310.39) -437.05,2300.39 212.95,2300.39 ccw(c212.95,2310.39) 222.95,2310.39 ccw(c212.95,2310.39) 212.95,2320.39 -437.05,2320.39 ccw(c-437.05,2310.39) -447.05,2310.39 ; 48.31,2460 cw(c58.31,2460) 58.31,2470 708.31,2470 cw(c708.31,2460) 718.31,2460 cw(c708.31,2460) 708.31,2450 58.31,2450 cw(c58.31,2460) 48.31,2460 ; 537.2,2310.39 cw(c547.2,2310.39) 547.2,2320.39 1197.2,2320.39 cw(c1197.2,2310.39) 1207.2,2310.39 cw(c1197.2,2310.39) 1197.2,2300.39 547.2,2300.39 cw(c547.2,2310.39) 537.2,2310.39 ; 1032.56,2460 cw(c1042.56,2460) 1042.56,2470 1692.56,2470 cw(c1692.56,2460) 1702.56,2460 cw(c1692.56,2460) 1692.56,2450 1042.56,2450 cw(c1042.56,2460) 1032.56,2460
  lines w40: 2011.06,3508.27 ccw(c1932.32,3508.27) 1932.32,3587.01 -1847.2,3587.01 ccw(c-1847.2,3508.27) -1925.94,3508.27 -1925.94,-271.26 ccw(c-1847.2,-271.26) -1847.2,-350 1932.32,-350 ccw(c1932.32,-271.26) 2011.06,-271.26 2011.06,3508.27 ; 2011.06,3508.27 2011.06,3508.27

## Silkscreen, mask and mechanical layers (free items; w line width, h text height)
Top Overlay:
  lines w40: 507.91,3474.61 1007.91,3474.61
  text "A" at 507.91,3399.61 h140 r270
  text "B" at 707.91,3399.61 h140 r270
  text "C" at 907.91,3399.61 h140 r270
  text "A" at -992.09,2099.61 h140
  text "B" at 7.91,2099.61 h140
  text "C" at 1007.91,2099.61 h140
  text "A" at -19.04,1685.02 h140
  text "-12V" at -1766.23,1648.31 h60 r90
  text "GND" at -1666.23,1648.31 h60 r90
  text "+5V" at -1566.23,1648.31 h60 r90
  text "+12V" at -1466.23,1648.31 h60 r90
  text "B" at 7.91,721.65 h140
  text "C" at 692.95,721.65 h140
  text "A" at -314.96,157.48 h200
  text "B" at 354.33,157.48 h200
  text "C" at 984.25,157.48 h200
Mechanical 1:
  lines w5: 2013.56,-271.26 ccw(c2011.06,-271.26) 2013.56,-271.21 ; 2013.56,-271.26 ccw(c2011.06,-271.26) 2013.56,-271.21 ; 2013.56,-271.26 cw(c1932.32,-271.26) 1932.32,-352.5 -1847.2,-352.5 cw(c-1847.2,-271.26) -1928.45,-271.26 -1928.45,3508.27 cw(c-1847.2,3508.27) -1847.2,3589.51 1932.32,3589.51 cw(c1932.32,3508.27) 2013.56,3508.27 2013.56,-271.21 ; 2013.56,-271.26 2013.56,-271.21 ; -1428.8,2310.39 cw(c-1421.3,2310.39) -1421.3,2317.89 -771.3,2317.89 cw(c-771.3,2310.39) -763.8,2310.39 cw(c-771.3,2310.39) -771.3,2302.89 -1421.3,2302.89 cw(c-1421.3,2310.39) -1428.8,2310.39 ; -933.44,2460 cw(c-925.94,2460) -925.94,2467.5 -275.94,2467.5 cw(c-275.94,2460) -268.45,2460 cw(c-275.94,2460) -275.94,2452.5 -925.94,2452.5 cw(c-925.94,2460) -933.44,2460 ; -891.48,1177.4 ccw(c-883.98,1177.4) -883.98,1169.9 ccw(c-883.98,1177.4) -876.48,1177.4 -876.48,1337.4 cw(c-793.98,1337.4) -793.98,1419.9 cw(c-793.98,1337.4) -711.48,1337.4 -711.48,1177.4 ccw(c-703.98,1177.4) -703.98,1169.9 ccw(c-703.98,1177.4) -696.48,1177.4 -696.48,1337.4 ccw(c-793.98,1337.4) -793.98,1434.9 ccw(c-793.98,1337.4) -891.48,1337.4 -891.48,1177.4 ; -444.55,2310.39 cw(c-437.05,2310.39) -437.05,2317.89 212.95,2317.89 cw(c212.95,2310.39) 220.45,2310.39 cw(c212.95,2310.39) 212.95,2302.89 -437.05,2302.89 cw(c-437.05,2310.39) -444.55,2310.39 ; 50.81,2460 cw(c58.31,2460) 58.31,2467.5 708.31,2467.5 cw(c708.31,2460) 715.81,2460 cw(c708.31,2460) 708.31,2452.5 58.31,2452.5 cw(c58.31,2460) 50.81,2460 ; 539.71,2310.39 cw(c547.2,2310.39) 547.2,2317.89 1197.2,2317.89 cw(c1197.2,2310.39) 1204.7,2310.39 cw(c1197.2,2310.39) 1197.2,2302.89 547.2,2302.89 cw(c547.2,2310.39) 539.71,2310.39 ; 1035.06,2460 cw(c1042.56,2460) 1042.56,2467.5 1692.56,2467.5 cw(c1692.56,2460) 1700.06,2460 cw(c1692.56,2460) 1692.56,2452.5 1042.56,2452.5 cw(c1042.56,2460) 1035.06,2460

## Text inside footprints (layer, text, board x,y; h text height)
JP5: Top Overlay "10" at -663,-53 h40; Top Overlay "9" at -663,-153 h40; Top Overlay "1" at -1525,-145 h40; Top Overlay "2" at -1535,-45 h40